# Altium PCB Stepper Board-v1.0.PcbDoc (part 8 of 8)
Units mil, origin at the board's own origin, x right, y up, seen from the top; angles counter-clockwise.
Board outline 6225.19 x 6531 mil, 4 copper layers (Top Layer, Layer-1, Layer-2, Bottom Layer), stack 61.654 mil thick; 410 components, 372 nets, 1464 pads, 1083 vias.
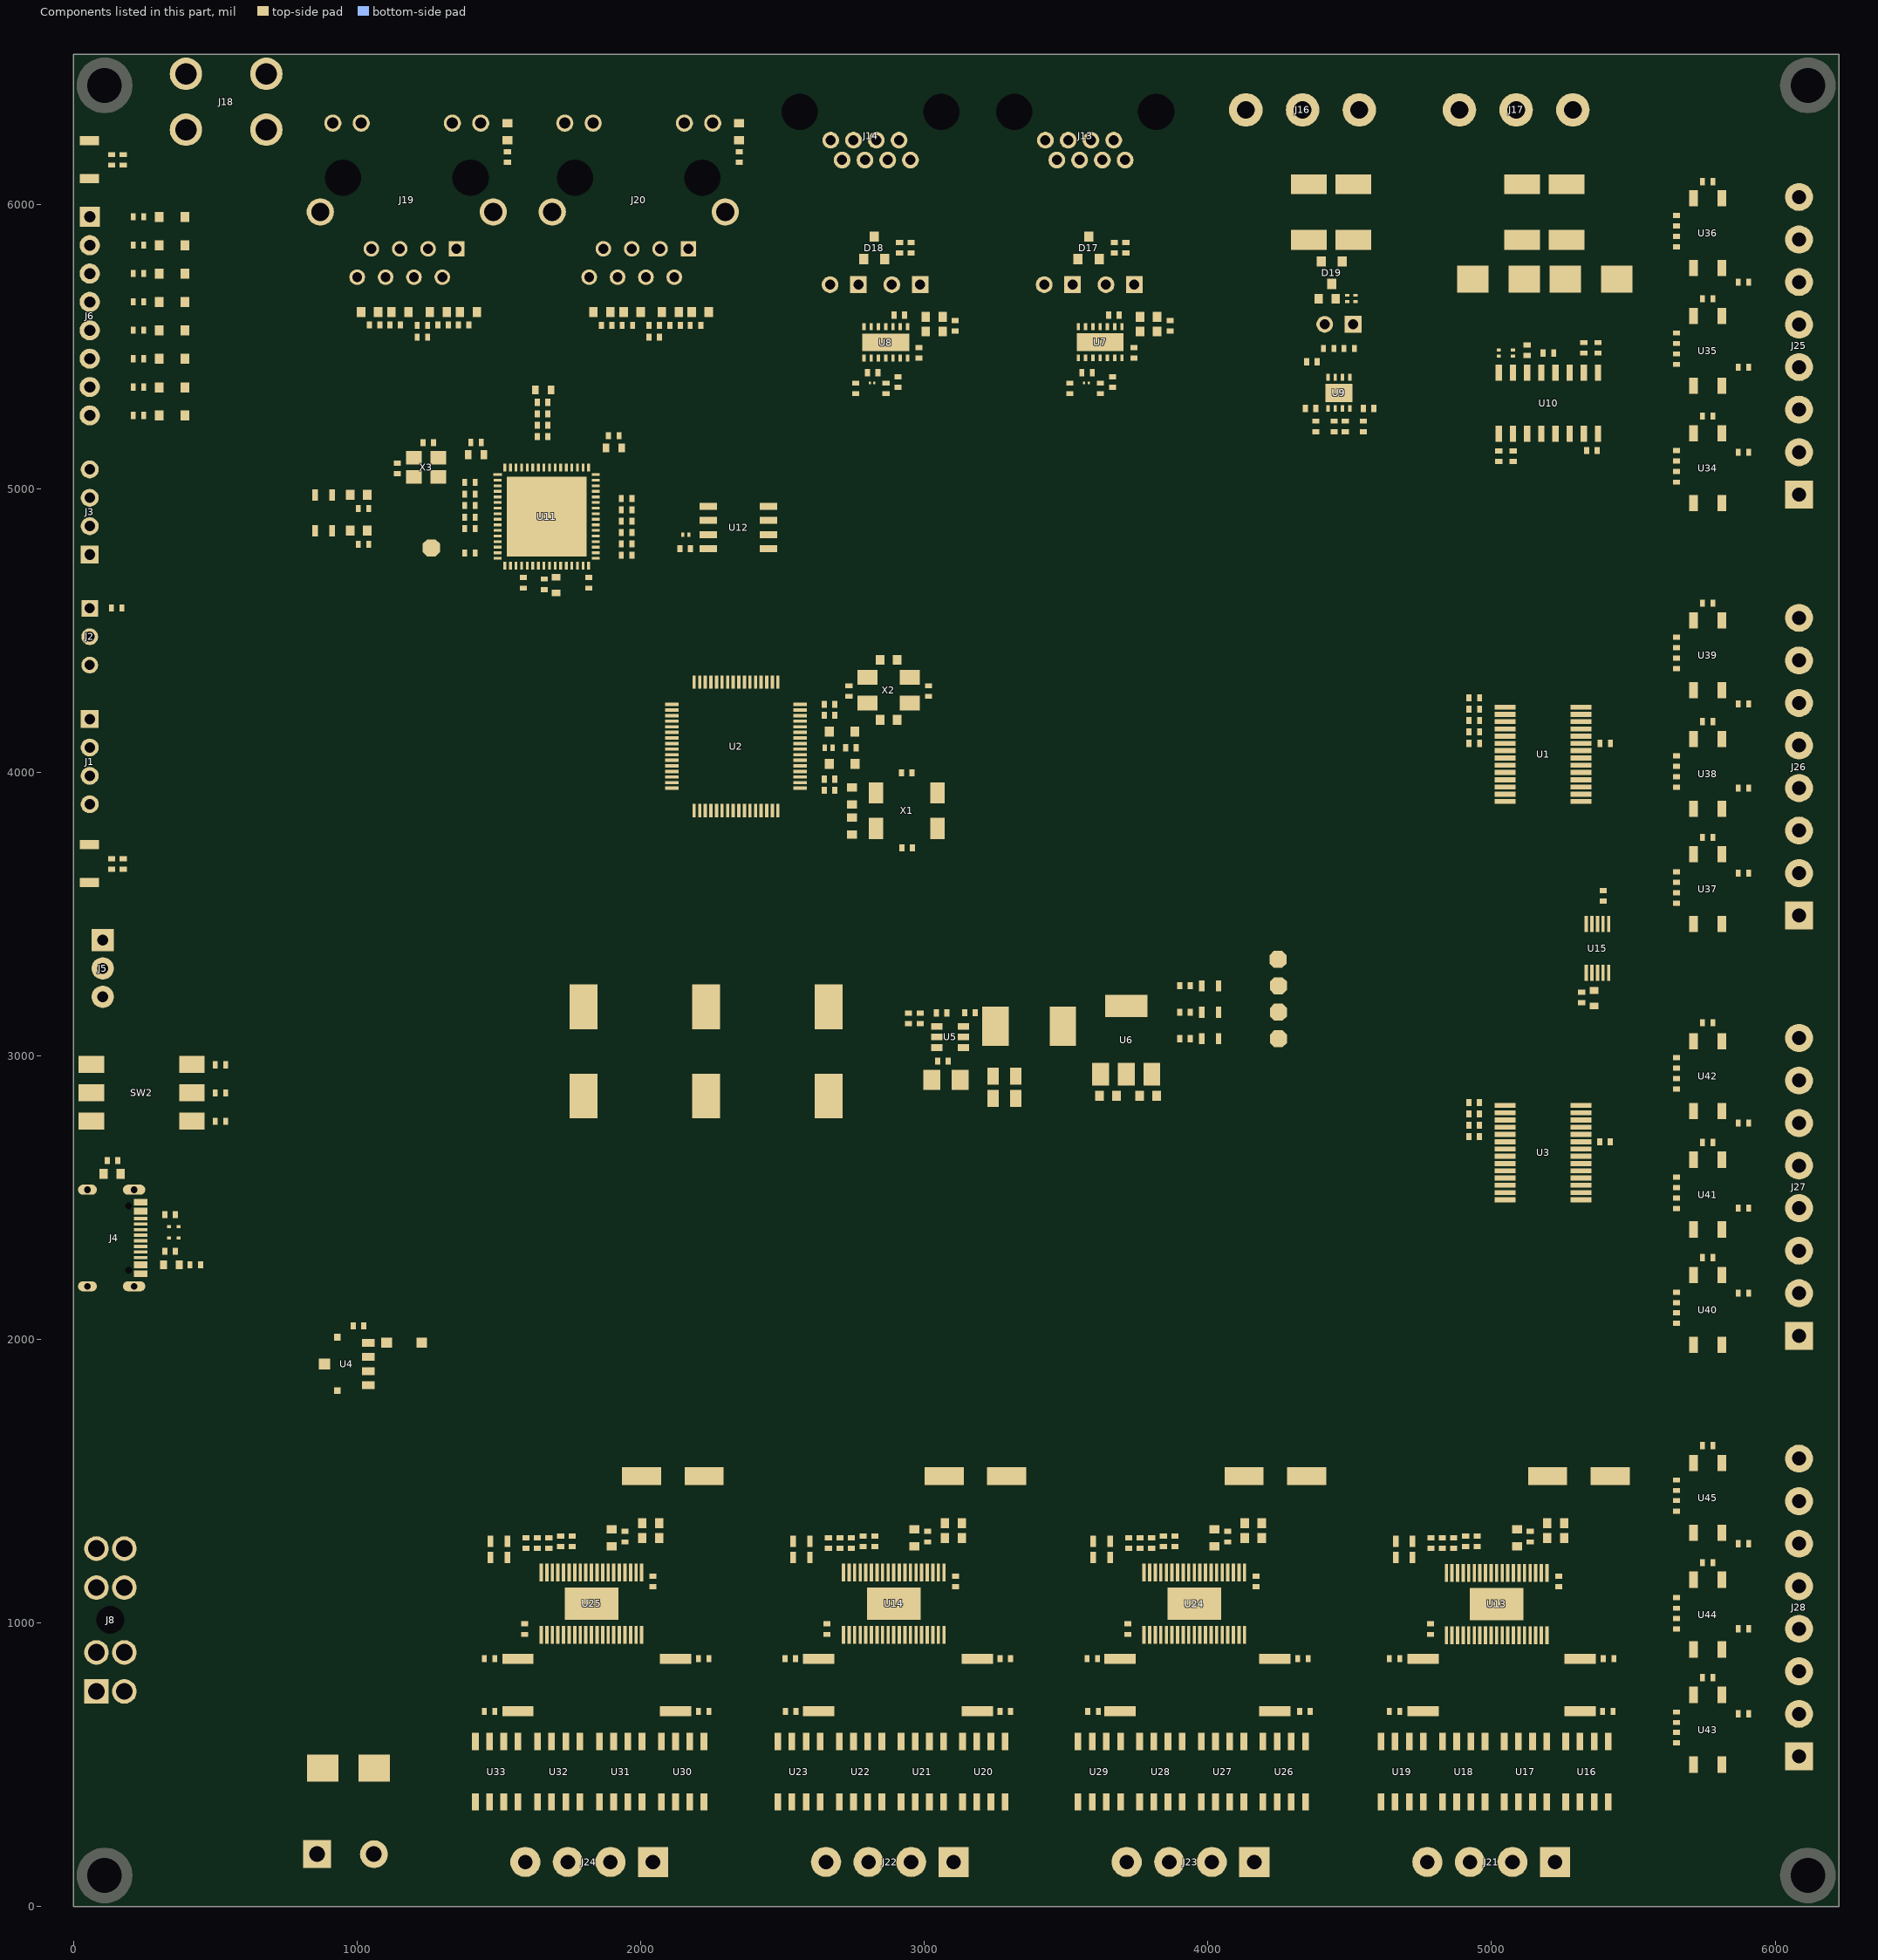
[diagram p7: the components of this part, seen from the top]

## Polygon pours and split planes (outlines as drawn) (continued)
BOUT1-1 on Layer-1 "NONET_L-01_P-001" (solid, remove dead copper, pour order 104): 5004,451.98 4924,451.98 4924,279.5 4989.33,279.5 4989.33,81.34 4846,81.34 4846,233.34 4786,293.34 4786,552 5004,552
BOUT2-1 on Layer-1 "NONET_L-01_P-001" (solid, remove dead copper, pour order 103): 4774,272.98 4832.23,214.75 4832.23,86.98 4498,86.98 4498,449.98 4498,553 4774,553
AOUT2-2 on Layer-1 "NONET_L-01_P-001" (solid, remove dead copper, pour order 98): 3960.56,451.98 4036.67,451.98 4036.67,278.86 3939.67,278.86 3939.67,81.34 4088.67,81.34 4088.67,214.12 4174.67,300.12 4174.67,552 4054.67,552 3960.56,552
AOUT1-2 on Layer-1 "NONET_L-01_P-001" (solid, remove dead copper, pour order 97): 4450.67,552 4450.67,85 4099.52,85 4099.52,200.85 4187.67,289 4187.67,552
BOUT1-2 on Layer-1 "NONET_L-01_P-001" (solid, remove dead copper, pour order 96): 3943.67,451.98 3863.67,451.98 3863.67,279.5 3929,279.5 3929,81.34 3785.67,81.34 3785.67,233.34 3725.67,293.34 3725.67,552 3943.67,552
BOUT2-2 on Layer-1 "NONET_L-01_P-001" (solid, remove dead copper, pour order 95): 3713.67,272.98 3771.9,214.75 3771.9,86.98 3437.67,86.98 3437.67,449.98 3437.67,553 3713.67,553
AOUT2-3 on Layer-1 "NONET_L-01_P-001" (solid, remove dead copper, pour order 90): 2900.22,451.98 2976.33,451.98 2976.33,280 2879.33,280 2879.33,81.34 3028.33,81.34 3028.33,214.12 3114.33,300.12 3114.33,552 2994.33,552 2900.22,552
AOUT1-3 on Layer-1 "NONET_L-01_P-001" (solid, remove dead copper, pour order 89): 3390.33,552 3390.33,85 3039.18,85 3039.18,200.85 3127.33,289 3127.33,552
BOUT1-3 on Layer-1 "NONET_L-01_P-001" (solid, remove dead copper, pour order 88): 2883.33,451.98 2803.33,451.98 2803.33,279.5 2868.67,279.5 2868.67,81.34 2725.33,81.34 2725.33,233.34 2665.33,293.34 2665.33,552 2883.33,552
BOUT2-3 on Layer-1 "NONET_L-01_P-001" (solid, remove dead copper, pour order 87): 2653.33,272.98 2711.57,214.75 2711.57,86.98 2377.33,86.98 2377.33,449.98 2377.33,553 2653.33,553
AOUT1-4 on Layer-1 "NONET_L-01_P-001" (solid, remove dead copper, pour order 77): 2330,552 2330,85 1978.85,85 1978.85,200.85 2067,289 2067,552
BOUT2-4 on Layer-1 "NONET_L-01_P-001" (solid, remove dead copper, pour order 73): 1593,272.98 1651.23,214.75 1651.23,86.98 1317,86.98 1317,449.98 1317,553 1593,553
AOUT2-4 on Layer-1 "NONET_L-01_P-001" (solid, remove dead copper, pour order 78): 1839.89,451.98 1916,451.98 1916,278.86 1819,278.86 1819,81.34 1968,81.34 1968,214.12 2054,300.12 2054,552 1934,552 1839.89,552
BOUT1-4 on Layer-1 "NONET_L-01_P-001" (solid, remove dead copper, pour order 74): 1823,451.98 1743,451.98 1743,279.5 1808.33,279.5 1808.33,81.34 1665,81.34 1665,233.34 1605,293.34 1605,552 1823,552
VDD12TX1 on Layer-1 "NONET_L-01_P-001" (solid, remove dead copper, pour order 24): 1647,4609 1647,4726 1593,4726 1572,4726 1572,5274.25 1674.5,5274.25 1674.5,5093.41 1753.25,5093.41 1753.25,4609
+24V on Bottom Layer "NONET_L-01_P-001" (solid, remove dead copper, pour order 40): 3393,3050 3393,2718.19 5634,2718.19 5634,485.3 6211.28,485.3 6211.28,17 1332,17 1332,3050
+5V on Bottom Layer "NONET_L-01_P-001" (solid, remove dead copper, pour order 20): 3416,2752.36 3416,3066.01 2881,3066.01 2881,3394 5597,3394 5650,3447 5650,5383 2738.11,5383 2738.11,5721 5636.39,5721 5636.39,6120.31 6213,6120.31 6213,529.29 5670,529.29 5670,2752.36
GND on Bottom Layer "NONET_L-01_P-001" (solid, remove dead copper, pour order 86): 2830,3419 2830,3079 1278.98,3079 1278.98,9 11,9 11,6524 6222.19,6524 6222.19,3419
NetFB1_1 on Bottom Layer "NONET_L-01_P-001" (solid, remove dead copper, pour order 27): 295.32,2479.69 115,2479.69 115,2234.21 329.25,2234.21 329.25,2284.47 202.51,2284.47 202.51,2435.28 295.32,2435.28
NetD14_2 on Bottom Layer "NETD14_2_L04_P022" (solid, remove dead copper, pour order 22): 11,946.5 11,9 947,9 947,945.5 314,945.5 314,946.5
GND on Layer-2 "NONET_L-01_P-001" (solid, remove dead copper, pour order 79): 11,6524 6213,6524 6213,12 11,12
VDDCR on Layer-2 "NONET_L-01_P-001" (solid, remove dead copper, pour order 28): 1850.69,5004 1850.69,4863 1930.3,4863 1930.3,4788.33 1757.13,4788.33 1757.13,4659.53 1688.39,4659.53 1688.39,4929 1424,4929 1424,5004

## Other copper
Top Layer:
  rectangle net +3V3: 1671,5331.25 1724,5366
  region net VDD33TXRX1: 1853.3,5348.76 1853.3,5126.55 1898.41,5126.55 1898.41,5348.76
  rectangle net VDD33TXRX2: 1425.6,5103 1471.55,5320
  rectangle net SPI2_MISO: 1663.56,1242.5 1691.56,1272.5
  rectangle net SPI2_MISO: 2730.56,1242.5 2758.56,1272.5
  rectangle net SPI2_MISO: 4854.56,1242.5 4882.56,1272.5
  rectangle net SPI2_MISO: 3788.99,1242.5 3816.99,1272.5
  rectangle net AISENN-2: 4341.5,857.02 4396,890.24
  rectangle net +24V: 4029.43,1400.07 4219.43,1667.07
  region net GND_B-3: 2559.19,709 2538.19,709 2538.19,666 2559.19,666
  rectangle net GND_A-3: 3258,666 3279,709
  rectangle net GND: 4664.17,855.31 4761.17,890.74
  region net BISENN-1: 4653.67,890.74 4599.17,890.74 4599.17,857.52 4653.67,857.52
  rectangle net GND: 3595.17,855.63 3692.17,891.07
  region net BISENN-2: 3584.67,890.07 3530.17,890.07 3530.17,856.85 3584.67,856.85
  rectangle net GND: 2531.17,856.28 2628.17,891.72
  region net BISENN-3: 2520.67,890.72 2466.17,890.72 2466.17,857.5 2520.67,857.5
  rectangle net GND: 1472.17,855.8 1569.17,891.24
  region net BISENN-4: 1461.67,890.24 1407.17,890.24 1407.17,857.02 1461.67,857.02
  region net GND: 2219.69,891.72 2122.69,891.72 2122.69,856.28 2219.69,856.28
  rectangle net AISENN-4: 2230.19,857.5 2284.69,890.72
  region net GND: 3284.17,891.72 3187.17,891.72 3187.17,856.28 3284.17,856.28
  rectangle net AISENN-3: 3294.67,857.5 3349.17,890.72
  region net GND: 4331,891.24 4234,891.24 4234,855.8 4331,855.8
  rectangle net AISENN-1: 5417.5,857.02 5472,890.24
  rectangle net AISENP-1: 5419.5,671.98 5471,705.2
  rectangle net AISENP-2: 4348.5,671.98 4403,705.2
  rectangle net AISENP-3: 3289.5,671.98 3344,705.2
  rectangle net AISENP-4: 2229.5,671.98 2284,705.2
  region net BISENP-4: 1462.83,660 1462.83,731.04 1431.83,731.04 1431.83,660
  region net GND_B-4: 1494.52,709 1473.52,709 1473.52,666 1494.52,666
  region net BISENP-3: 2527.5,660 2527.5,731.04 2496.5,731.04 2496.5,660
  region net GND_B-2: 3618.19,709 3597.19,709 3597.19,666 3618.19,666
  rectangle net GND_B-2: 3597.19,675.98 3651.94,700.98
  region net BISENP-2: 3586.5,660 3586.5,731.04 3555.5,731.04 3555.5,660
  region net GND_B-1: 4686.19,709 4665.19,709 4665.19,666 4686.19,666
  rectangle net GND_A-4: 2196,666 2217,709
  rectangle net GND_A-2: 4317,666 4338,709
  region net GND_A-2: 4338.17,659.56 4338.17,680.56 4295.17,680.56 4295.17,659.56
  region net GND_A-1: 5406.17,659.56 5406.17,680.56 5363.17,680.56 5363.17,659.56
  rectangle net GND_A-1: 5385,660 5406,715
  region net BISENP-1: 4654.5,660 4654.5,731.04 4623.5,731.04 4623.5,660
  rectangle net GND_B-1: 4671.69,675.98 4726.19,700.98
  region net +5V: 5846.89,5441.79 5846.89,5382.8 5879.77,5382.8 5879.77,5441.79
  region net +5V: 5846.89,2476.13 5846.89,2417.13 5879.77,2417.13 5879.77,2476.13
  region net +5V: 5846.89,992.79 5846.89,933.8 5879.77,933.8 5879.77,992.79
  region net +5V: 5879.77,1265.79 5879.77,1324.79 5846.89,1324.79 5846.89,1265.79
  region net +5V: 5879.77,665.79 5879.77,724.79 5846.89,724.79 5846.89,665.79
  region net +5V: 5879.77,5714.79 5879.77,5773.79 5846.89,5773.79 5846.89,5714.79
  region net +5V: 5879.77,5114.79 5879.77,5173.79 5846.89,5173.79 5846.89,5114.79
  region net +5V: 5879.77,2149.13 5879.77,2208.12 5846.89,2208.12 5846.89,2149.13
  region net +5V: 5879.77,2748.79 5879.77,2807.79 5846.89,2807.79 5846.89,2748.79
  region net +5V: 5879.77,3630.46 5879.77,3689.45 5846.89,3689.45 5846.89,3630.46
  region net +5V: 5879.77,4227.46 5879.77,4286.45 5846.89,4286.45 5846.89,4227.46
  rectangle net DIR+_1: 5890.89,5415.79 5946.14,5440.79
  region net +5V: 5851,3957.46 5851,3898.47 5883.89,3898.47 5883.89,3957.46
  rectangle net DIR+_3: 5893.89,3931.46 5949.14,3956.46
  rectangle net DIR+_2: 5890.89,2450.13 5946.14,2475.13
  rectangle net PUL+_1: 5890.89,5715.79 5946.14,5740.79
  rectangle net ENA+_1: 5890.89,5115.79 5946.14,5140.79
  rectangle net PUL+_3: 5890.89,4228.46 5946.14,4253.46
  rectangle net ENA+_3: 5890.89,3631.46 5946.14,3656.46
  rectangle net PUL+_2: 5890.89,2749.79 5946.14,2774.79
  rectangle net ENA+_2: 5890.89,2150.13 5946.14,2175.13
  rectangle net PUL+_4: 5890.89,1266.79 5946.14,1291.79
  rectangle net DIR+_4: 5890.89,966.79 5946.14,991.79
  rectangle net ENA+_4: 5890.89,666.79 5946.14,691.79
  region net GND: 5407,891.24 5310,891.24 5310,855.8 5407,855.8
  rectangle net +24V: 4279.54,27 4680,435.3
  rectangle net +24V: 3213.54,22 3613,435.3
  rectangle net +24V: 2153,21 2550,435.3
  rectangle net +24V: 1395.54,291.32 1482.51,435.3
  region net +24V: 5433.46,435.3 5346.49,435.3 5346.49,291.32 5433.46,291.32
  rectangle net +24V: 4915.52,333.49 5106.48,394.52
  rectangle net +24V: 4916.55,291.32 5110.18,435.3
  rectangle net +24V: 3847.52,338.19 4038.48,399.21
  rectangle net +24V: 3848.55,296.02 4042.18,440
  rectangle net +24V: 2789.55,296.02 2983.18,440
  rectangle net GND: 3661,2789.03 3765,3158
  rectangle net AOUT1-4: 2069.19,338.19 2142.81,399.21
  rectangle net AOUT2-4: 1951.86,338.19 2025.48,399.21
  rectangle net +24V: 1722.52,296.02 1916.14,440
  rectangle net BOUT1-4: 1634.52,338.19 1708.14,399.21
  rectangle net BOUT2-4: 1517.19,338.19 1590.81,399.21
  rectangle net AOUT1-3: 3129.52,338.19 3203.14,399.21
  rectangle net AOUT2-3: 3012.19,338.19 3085.81,399.21
  rectangle net BOUT1-3: 2694.86,338.19 2768.48,399.21
  rectangle net BOUT2-3: 2577.52,338.19 2651.14,399.21
  rectangle net AOUT1-2: 4189.86,338.19 4263.48,399.21
  rectangle net AOUT2-2: 4072.52,338.19 4146.14,399.21
  rectangle net BOUT1-2: 3755.19,338.19 3828.81,399.21
  rectangle net BOUT2-2: 3637.86,338.19 3711.48,399.21
  rectangle net GND: 2522,3079 2779,3275
  rectangle net GND: 2089.5,3079 2346.5,3275
  rectangle net GND: 1657,3079 1914,3275
  rectangle net +24V: 1405.19,338.19 1478.81,399.21
  rectangle net BOUT2-4: 1505.19,338.19 1578.81,399.21
  rectangle net BOUT1-4: 1623.86,338.19 1697.48,399.21
  rectangle net +24V: 1723.86,338.19 1916.14,399.21
  rectangle net AOUT2-4: 1942.52,338.19 2016.14,399.21
  rectangle net AOUT1-4: 2061.19,338.19 2134.81,399.21
  rectangle net BOUT2-3: 2571.19,338.19 2644.81,399.21
  rectangle net BOUT1-3: 2688.52,338.19 2762.14,399.21
  rectangle net +24V: 2788.52,338.19 2979.48,399.21
  rectangle net AOUT2-3: 3005.86,338.19 3079.48,399.21
  rectangle net AOUT1-3: 3123.19,338.19 3196.81,399.21
  rectangle net BOUT2-2: 3630.19,338.19 3703.81,399.21
  rectangle net BOUT1-2: 3747.52,338.19 3821.14,399.21
  rectangle net AOUT2-2: 4064.86,338.19 4138.48,399.21
  rectangle net BOUT2-1: 4698.19,338.19 4771.81,399.21
  rectangle net BOUT1-1: 4815.52,338.19 4889.14,399.21
  rectangle net AOUT2-1: 5132.86,338.19 5206.48,399.21
  rectangle net AOUT1-1: 5250.19,338.19 5323.81,399.21
  rectangle net +24V: 5100,1400.07 5290,1667.07
  rectangle net +24V: 2972,1400.07 3162,1667.07
  rectangle net +24V: 1905,1400.07 2095,1667.07
  rectangle net GND: 5072.55,1313.15 5148.73,1333.15
  rectangle net GND: 4006.55,1314.48 4082.73,1334.48
  rectangle net GND: 2946.55,1315.13 3022.73,1335.13
  rectangle net GND: 1880.54,1315.13 1956.73,1335.13
  rectangle net GND: 5096.85,1009.17 5151,1123.35
  rectangle net GND: 4030.85,1010.5 4087,1124.67
  rectangle net GND: 1904.85,1011.15 1958,1125.32
  rectangle net GND: 2970.85,1011.82 3025,1126
  region net GND: 4993.52,5823 4879.09,5823 4879.09,5647 4993.52,5647
  rectangle net GND: 5382,5647 5496.43,5823
  rectangle net AOUT1-2: 4182.19,338.19 4255.81,399.21
  region net NetR128_2: 5733.89,5746.19 5733.89,5863.62 5687.56,5863.62 5687.56,5746.19
  region net NetR128_2: 5732.67,5863.62 5638.89,5863.62 5638.89,5832.58 5732.67,5832.58
  region net NetR127_2: 5733.89,5332.19 5733.89,5449.62 5687.56,5449.62 5687.56,5332.19
  region net NetR127_2: 5732.67,5449.62 5638.89,5449.62 5638.89,5418.58 5732.67,5418.58
  region net NetR126_2: 5733.89,4917.19 5733.89,5034.62 5687.56,5034.62 5687.56,4917.19
  region net NetR126_2: 5732.67,5034.62 5638.89,5034.62 5638.89,5003.58 5732.67,5003.58
  region net NetR131_2: 5733.89,4259.19 5733.89,4376.62 5687.56,4376.62 5687.56,4259.19
  region net NetR131_2: 5732.67,4376.62 5638.89,4376.62 5638.89,4345.58 5732.67,4345.58
  region net NetR130_2: 5733.89,3840.69 5733.89,3958.12 5687.56,3958.12 5687.56,3840.69
  region net NetR130_2: 5732.67,3958.12 5638.89,3958.12 5638.89,3927.08 5732.67,3927.08
  region net NetR129_2: 5733.89,3432.19 5733.89,3549.62 5687.56,3549.62 5687.56,3432.19
  region net NetR129_2: 5732.67,3549.62 5638.89,3549.62 5638.89,3518.58 5732.67,3518.58
  region net NetR146_2: 5733.89,2777.19 5733.89,2894.62 5687.56,2894.62 5687.56,2777.19
  region net NetR146_2: 5732.67,2894.62 5638.89,2894.62 5638.89,2863.58 5732.67,2863.58
  region net NetR145_2: 5733.89,2355.69 5733.89,2473.12 5687.56,2473.12 5687.56,2355.69
  region net NetR145_2: 5732.67,2473.12 5638.89,2473.12 5638.89,2442.08 5732.67,2442.08
  region net NetR144_2: 5733.89,1951.19 5733.89,2068.62 5687.56,2068.62 5687.56,1951.19
  region net NetR144_2: 5732.67,2068.62 5638.89,2068.62 5638.89,2037.58 5732.67,2037.58
  region net NetR149_2: 5733.89,1288.69 5733.89,1406.12 5687.56,1406.12 5687.56,1288.69
  region net NetR149_2: 5732.67,1406.12 5638.89,1406.12 5638.89,1375.08 5732.67,1375.08
  region net NetR148_2: 5733.89,873.19 5733.89,990.62 5687.56,990.62 5687.56,873.19
  region net NetR148_2: 5732.67,990.62 5638.89,990.62 5638.89,959.58 5732.67,959.58
  region net NetR147_2: 5732.67,589.12 5638.89,589.12 5638.89,558.08 5732.67,558.08
  region net NetR147_2: 5733.89,471.69 5733.89,589.12 5687.56,589.12 5687.56,471.69
  region net NetR153_1: 5687.56,822.5 5687.56,673.96 5733.89,673.96 5733.89,822.5
  region net NetR153_1: 5732.67,705 5638.89,705 5638.89,673.96 5732.67,673.96
  rectangle net NetR153_1: 5687.56,791.46 5756.39,822.5
  region net NetR154_1: 5687.56,1225.5 5687.56,1076.96 5733.89,1076.96 5733.89,1225.5
  region net NetR154_1: 5732.67,1108 5638.89,1108 5638.89,1076.96 5732.67,1076.96
  rectangle net NetR154_1: 5687.56,1194.46 5756.39,1225.5
  region net NetR155_1: 5687.56,1640.5 5687.56,1491.96 5733.89,1491.96 5733.89,1640.5
  region net NetR155_1: 5732.67,1523 5638.89,1523 5638.89,1491.96 5732.67,1491.96
  rectangle net NetR155_1: 5687.56,1609.46 5756.39,1640.5
  region net NetR150_1: 5687.56,2303 5687.56,2154.46 5733.89,2154.46 5733.89,2303
  region net NetR150_1: 5732.67,2185.5 5638.89,2185.5 5638.89,2154.46 5732.67,2154.46
  rectangle net NetR150_1: 5687.56,2271.96 5756.39,2303
  region net NetR151_1: 5687.56,2708.5 5687.56,2559.96 5733.89,2559.96 5733.89,2708.5
  region net NetR151_1: 5732.67,2591 5638.89,2591 5638.89,2559.96 5732.67,2559.96
  rectangle net NetR151_1: 5687.56,2677.46 5756.39,2708.5
  region net NetR152_1: 5687.56,3130.5 5687.56,2981.96 5733.89,2981.96 5733.89,3130.5
  region net NetR152_1: 5732.67,3013 5638.89,3013 5638.89,2981.96 5732.67,2981.96
  rectangle net NetR152_1: 5687.56,3099.46 5756.39,3130.5
  region net NetR135_1: 5687.56,3785.5 5687.56,3636.96 5733.89,3636.96 5733.89,3785.5
  region net NetR135_1: 5732.67,3668 5638.89,3668 5638.89,3636.96 5732.67,3636.96
  rectangle net NetR135_1: 5687.56,3754.46 5756.39,3785.5
  region net NetR136_1: 5687.56,4194 5687.56,4045.46 5733.89,4045.46 5733.89,4194
  region net NetR136_1: 5732.67,4076.5 5638.89,4076.5 5638.89,4045.46 5732.67,4045.46
  rectangle net NetR136_1: 5687.56,4162.96 5756.39,4194
  region net NetR137_1: 5687.56,4612.5 5687.56,4463.96 5733.89,4463.96 5733.89,4612.5
  region net NetR137_1: 5732.67,4495 5638.89,4495 5638.89,4463.96 5732.67,4463.96
  rectangle net NetR137_1: 5687.56,4581.46 5756.39,4612.5
  region net NetR132_1: 5687.56,5270.5 5687.56,5121.96 5733.89,5121.96 5733.89,5270.5
  region net NetR132_1: 5732.67,5153 5638.89,5153 5638.89,5121.96 5732.67,5121.96
  rectangle net NetR132_1: 5687.56,5239.46 5756.39,5270.5
  region net NetR133_1: 5687.56,5685.5 5687.56,5536.96 5733.89,5536.96 5733.89,5685.5
  region net NetR133_1: 5732.67,5568 5638.89,5568 5638.89,5536.96 5732.67,5536.96
  rectangle net NetR133_1: 5687.56,5654.46 5756.39,5685.5
  rectangle net NetR134_1: 5687.56,6068.46 5756.39,6099.5
  region net NetR134_1: 5732.67,5982 5638.89,5982 5638.89,5950.96 5732.67,5950.96
  region net NetR134_1: 5687.56,6099.5 5687.56,5950.96 5733.89,5950.96 5733.89,6099.5
  region net +3V3: 2660.75,3924.18 2660.75,4047.44 2636.75,4047.44 2636.75,3924.18
  rectangle net +3V3: 2636.38,4008.64 2698.64,4048.01
  region net +3V3: 2695.5,4186.81 2695.5,4252.31 2674,4252.31 2674,4186.81
  region net GND: 2695.5,3922.93 2695.5,3988.43 2674,3988.43 2674,3922.93
  region net GND: 2778.13,4010.76 2778.13,4161.34 2750.5,4161.34 2750.5,4010.76
  region net NetC9_2: 2705.13,4068 2705.13,4160.72 2665.76,4160.72 2665.76,4068
  rectangle net NetC9_2: 2666,4067.38 2731.5,4106.75
  region net NetC78_1: 5299,3242.99 5299,3214 5379.54,3214 5379.54,3242.99
  rectangle net GND: 1660.98,5167.2 1684.3,5316.5
  rectangle net NetR75_2: 1626.5,5250.5 1649.82,5284
  rectangle net VDDCR: 1643.55,4672.02 1752.21,4698.89
  region net NetFB1_2: 419.5,2280 360.75,2280 360.75,2247.25 419.5,2247.25
  rectangle net +5V: 438.5,2246 495,2278.98
  rectangle net NetC10_2: 146.5,2509.06 259.63,2643.5
  rectangle net NetD13_1: 1011,1964 1131,2064
  region net NetJ8_3: 985,1079 985,2020 11,2020 11,1079
  rectangle net NetJ8_3: 16.39,1080.03 318.01,1966.01
  rectangle net +3V3: 4432.43,5183 4565,5213.75
  rectangle net RE/DE/RS485/T: 4441.05,5228.75 4482.25,5294.24
  region net GND: 5345.76,5270 5313.76,5270 5313.76,5117 5345.76,5117
  rectangle net +3V3: 5360.76,5117 5391,5270
  rectangle net +3V3: 835.55,4791.02 879.55,4997.21
  region net +3V3: 4374.55,5469.67 4374.55,5380.67 4429.55,5380.67 4429.55,5469.67
  region net "CHASIS GND": 2.15,52.1 2.15,182.28 cw(c7.16,182.28) 4.91,186.76 cw(c9.3,184.56) 5.37,187.51 cw(c111.17,108.44) 243.24,108.44 cw(c111.16,108.44) 191.08,3.28 cw(c188.05,7.26) 188.05,2.26 2.15,2.26
  region net "CHASIS GND": 6223.04,52.1 6223.04,182.28 ccw(c6218.03,182.28) 6220.28,186.76 ccw(c6215.89,184.56) 6219.81,187.51 ccw(c6114.02,108.44) 5981.94,108.43 ccw(c6114.02,108.43) 6034.1,3.28 ccw(c6037.14,7.26) 6037.14,2.26 6223.04,2.26
  region net "CHASIS GND": 6223.04,6478.9 6223.04,6348.72 cw(c6218.03,6348.72) 6220.28,6344.24 cw(c6215.89,6346.44) 6219.81,6343.49 cw(c6114.02,6422.56) 5981.94,6422.57 cw(c6114.02,6422.57) 6034.1,6527.72 cw(c6037.14,6523.74) 6037.14,6528.74 6223.04,6528.74
  pour cut-out: 801,6525.08 801,6522.38 801,5597.99 803,5595.99 2402,5595.99 2402,5837 3924,5837 3924,6524.44 3923.36,6525.08
  region net "CHASIS GND": 2.15,6478.9 2.15,6348.72 ccw(c7.16,6348.72) 4.91,6344.24 ccw(c9.3,6346.44) 5.37,6343.49 ccw(c111.16,6422.56) 243.24,6422.57 ccw(c111.16,6422.57) 191.08,6527.72 ccw(c188.05,6523.74) 188.05,6528.74 2.15,6528.74
Layer-1:
  region net VDD33TXRX2: 1426,5581 1426,5288 1471,5288 1471,5581
  rectangle net VDD33TXRX2: 1425.1,5549.41 1830,5593.21
Bottom Layer:
  region net VDD33TXRX1: 1898,5352 1730,5352 1730,5307 1898,5307
  region net VDD33TXRX1: 1775,5307 1775,5682.72 1730,5682.72 1730,5307
  region net VDD33TXRX2: 1830,5550 1830,5681.81 1785,5681.81 1785,5550
  rectangle net VDD33TXRX1: 996.63,5637.72 1739.83,5682.72
  rectangle net VDD33TXRX2: 1815,5637.55 2258,5682.55
  region net NetJ8_3: 985,1079 985,2020 11,2020 11,1079
  pour cut-out: 801,6525.08 801,6522.38 801,5597.99 803,5595.99 2402,5595.99 2402,5837 3924,5837 3924,6524.44 3923.36,6525.08

## Silkscreen, mask and mechanical layers (free items; w line width, h text height)
Top Overlay:
  lines w5: 2840,2135 2840,2245 3949,2245 3949,2135 3631,2135 2840,2135
  lines w6: 988,5549.29 988,5651.98 1448.12,5651.98 1448.12,5549.29 1269.12,5549.29 1269.12,5509.38 1188.04,5509.38 ; 989,5549.29 1188.12,5549.29 1188.12,5509.97 ; 1807,5550.32 1807,5652.01 1808,5653.01 2267,5653.01 2267,5550.32 2088,5550.32 2088,5510.41 2006.93,5510.41 ; 1808,5550.32 2007,5550.32 2007,5511 ; 742,5348.57 742,5470.26 1390,5470.26 1390,5348.57 1129.39,5348.57 1129.39,5285 993,5285 993,5348.57 742,5348.57 ; 1338,4359 1475.03,4359 1475.03,4640 1338,4640 1338,4359 ; 1357.2,4833.8 1357.7,4833.3 1357.39,4833 1463,4833 1463,5047 1357.2,5047 1357.2,4833.8 ; 1576.48,5158.8 1692.33,5158.8 1692.33,5372.8 1576.48,5372.8 1576.48,5158.8 ; 1790.9,5335 2041.9,5335 2041.9,5271.43 2178.29,5271.43 2178.29,5335 2433,5335 2433,5456.69 1790.9,5456.69 1790.9,5335 ; 2606,4805 2748,4805 2748,5094.63 2606,5094.63 2606,4805 ; 2625.7,3911.25 2625.7,4261 2705,4261 2705,4184 2779.71,4184 2779.71,3991.11 2705.13,3991.11 2705.13,3911.25 2625.7,3911.25 ; 3139.26,3870.88 3268.69,3870.88 3268.69,3990 3318,3990 3318,4167.48 3268.57,4167.48 3268.57,4284.48 3139.26,4284.48 3139.26,3870.88
  lines w7: 380,2291.68 403,2291.68 ; 380,2457.68 403,2457.68 ; 385,2355.68 403,2355.68 ; 385,2400 403,2400 ; 1555,1365 1555,1342.87 1576.87,1321 ; 1619.87,1324 1619.87,1364 ; 1659.87,1323 1659.87,1364 ; 1701.87,1328 1701.87,1362 ; 1747.87,1331 1747.87,1362 ; 2095.13,1299 2116.13,1299 ; 2631,1363 2631,1332 2644,1319 ; 2687,1322 2687,1362 ; 2727,1321 2727,1362 ; 2769,1326 2769,1360 ; 2815,1329 2815,1360 ; 2826.55,5316.46 2826.55,5356.46 ; 2912.96,5880.91 2912.96,5895.93 2920.96,5903.93 2969.58,5903.93 ; 3158.13,1299 3179.13,1299 ; 3159.13,1299 3180.13,1299 ; 3582.55,5315.46 3582.55,5355.46 ; 3670.03,5880.98 3670.03,5896 3678.03,5904 3726.65,5904 ; 3688.43,1363 3688.43,1332 3701.43,1319 ; 3744.43,1322 3744.43,1362 ; 3784.43,1321 3784.43,1362 ; 3826.43,1326 3826.43,1360 ; 3872.43,1329 3872.43,1360 ; 4216.56,1299 4237.56,1299 ; 4548.16,5171 4548.16,5182 ; 4755,1363 4755,1332 4768,1319 ; 4811,1322 4811,1362 ; 4851,1321 4851,1362 ; 4866,4069.08 4889.08,4069.08 4902,4082 ; 4869,4128.08 4902.46,4128.08 ; 4869,4297.92 4892.08,4297.92 4905,4285 ; 4881,4181 4902,4181 ; 4893,1326 4893,1360 ; 4939,1329 4939,1360 ; 5284.13,1299 5306,1299
  lines w40: 30,2041 736,2041 808,2113 1318,2113 1318,1444 1210,1336 1210,21
  text "RS485" at 4717.1,6174.79 h75 r90
  text "RS232" at 5470.1,6174.79 h75 r90
  text "CAN - OUT" at 2488.69,6173.5 h75 r90
  text "CAN - IN" at 3245.69,6173.5 h75 r90
  text "C-GND" at 351,6121.39 h75
  text "EXT-DRIVER-1" at 5845.28,6109.01 h60
  text "N" at 4226.38,6082.78 h55
  text "P" at 4583.75,6082.78 h55
  text "TX" at 4964.75,6082.78 h55
  text "RX" at 5333.75,6082.78 h55
  text "E-RST" at 112.55,6053.23 h65
  text "EtherCAT-IN" at 856.54,6051.39 h75 r90
  text "EtherCAT-OUT" at 1670.54,6050.16 h75 r90
  text "@-1" at 901.57,5612.39 h50
  text "@-2" at 2276.08,5612.39 h50
  text "@-1" at 654.81,5430.69 h50
  text "@-2" at 2442.08,5416.39 h50
  text "a" at 1623.12,5379.43 h50
  text "DIGITAL IOs" at 187.54,5205.54 h75 r90
  text "a" at 2664.12,5100.43 h50
  text "*" at 1401.6,5035.63 h60
  text "RUN" at 633.5,4951.04 h60
  text "ERROR" at 631.32,4825 h60
  text "SWD PORT" at 187.5,4716 h75 r90
  text "WAIT" at 1188.71,4698.78 h60
  text "*" at 1394.49,4629.11 h60
  text "EXT-DRIVER-2" at 5845.28,4624.68 h60
  text "BOOT" at 187.54,4324.7 h75 r90
  text "~" at 3146.29,4282.64 h60
  text "~" at 2632.73,4259.16 h60
  text "DEBUG" at 187.54,3834.27 h75 r90
  text "RST" at 112.62,3561.23 h65
  text "GND" at 4078,3311 h60
  text "3V3" at 4081,3220.54 h60
  text "EXT-DRIVER-3" at 5845.28,3143.35 h60
  text "5V" at 4081,3127.27 h60
  text "I2C" at 320.54,3107.27 h75 r90
  text "24V" at 4081,3034 h60
  text "STEPPER BOARD - v1.0" at 2847.67,2142.8 h100
  text "USB" at 10.4,2089.48 h75
  text "EXT-DRIVER-4" at 5845.28,1660.01 h60
  text "FUSE" at 7.57,1408.99 h65
  text "DRIVER-4" at 2214.99,3.86 h65 r90
  text "DRIVER-3" at 3275.32,3.86 h65 r90
  text "DRIVER-2" at 4335.65,3.86 h65 r90
  text "DRIVER-1" at 5395.99,3.86 h65 r90
  text "24V INPUT" at 754.6,1 h75 r90
Bottom Overlay:
  drawing of 19 lines, arcs and shapes, not listed
  text "24V" at 6030.37,5993.67 h60
  text "PD9" at 259.11,5928.27 h60
  text "GND" at 6030.37,5843.67 h60
  text "PD8" at 259.11,5828.27 h60
  text "PC7" at 259.11,5728.05 h60
  text "PUL+_1" at 6034.14,5693.67 h60
  text "PC6" at 259.11,5628.02 h60
  text "PUL-_1" at 6030.37,5543.67 h60
  text "PA8" at 259.11,5528.27 h60
  text "PB15" at 259.47,5428.27 h60
  text "DIR+_1" at 6030.37,5393.67 h60
  text "PB14" at 259.66,5328.27 h60
  text "DIR-_1" at 6030.37,5243.67 h60
  text "PB13" at 259.11,5228.27 h60
  text "ENA+_1" at 6032.12,5093.67 h60
  text "ENA-_1" at 6030.37,4943.67 h60
  text "24V" at 6030.37,4509.33 h60
  text "GND" at 6030.37,4359.33 h60
  text "PUL+_3" at 6037.33,4209.33 h60
  text "PUL-_3" at 6030.57,4059.33 h60
  text "DIR+_3" at 6030.37,3909.33 h60
  text "DIR-_3" at 6030.37,3759.33 h60
  text "ENA+_3" at 6035.31,3609.33 h60
  text "ENA-_3" at 6033.55,3459.33 h60
  text "SCL" at 305.66,3378.06 h60
  text "SDA" at 305.11,3278.06 h60
  text "24V" at 6028.37,3028 h60
  text "GND" at 6028.37,2878 h60
  text "PUL+_2" at 6035.33,2728 h60
  text "PUL-_2" at 6028.57,2578 h60
  text "DIR+_2" at 6028.37,2428 h60
  text "DIR-_2" at 6028.37,2278 h60
  text "ENA+_2" at 6033.31,2128 h60
  text "ENA-_2" at 6031.55,1978 h60
  text "ZERO CARBON FOOTPRINT" at 5480,1614 h40
  text "24V" at 6028.37,1544.67 h60
  text "GND" at 6028.37,1394.67 h60
  text "PUL+_4" at 6027.85,1244.67 h60
  text "PUL-_4" at 6029.1,1094.67 h60
  text "DIR+_4" at 6028.4,944.67 h60
  text "DIR-_4" at 6028.37,794.67 h60
  text "ENA+_4" at 6028.84,644.67 h60
  text "ENA-_4" at 6026,494.67 h60
  text "AOUT1-3" at 3066.71,215.54 h60 r270
  text "AOUT1-2" at 4127.04,215.74 h60 r270
  text "AOUT1-4" at 2006.37,215.01 h60 r270
  text "BOUT1-3" at 2766.71,214.5 h60 r270
  text "AOUT2-3" at 2916.71,214.54 h60 r270
  text "BOUT1-2" at 3827.04,214.7 h60 r270
  text "AOUT2-2" at 3977.04,214.74 h60 r270
  text "BOUT2-1" at 4737.38,214.69 h60 r270
  text "BOUT1-1" at 4887.38,214.69 h60 r270
  text "BOUT1-4" at 1706.38,213.97 h60 r270
  text "AOUT2-4" at 1856.37,214.01 h60 r270
  text "BOUT2-3" at 2616.71,213.5 h60 r270
  text "BOUT2-2" at 3677.04,213.7 h60 r270
  text "BOUT2-4" at 1556.38,212.97 h60 r270
  text "AOUT2-1" at 5037.38,212.73 h60 r270
  text "AOUT1-1" at 5187.38,212.73 h60 r270
  text "24V" at 940.38,4.3 h85
  text "GND" at 1157.4,4.3 h85
Top Solder:
  rectangle: 247.94,1080 985,1780
  rectangle: 10,1407.34 765,2019
  rectangle: 257,10 780.49,279
  rectangle: 249.78,563 949,946
  rectangle: 10,256 780,613
Bottom Solder:
  rectangle: 10,1407.34 985,2019
  rectangle: 249.78,1080 985,1467
  rectangle: 253,8 780.49,248.8
  rectangle: 10,245 780,613
  rectangle: 249.78,248.8 949,946
Board Outline:
  the board outline again, w20
Fabrication:
  drawing of 295 lines, arcs and shapes, not listed
  text "Layer" at 6857.09,2372.99 h60
  text "Name" at 7267,2372.99 h60
  text "Material" at 8196.74,2372.99 h60
  text "Thickness" at 9056.51,2372.99 h60
  text "Constant" at 9706.35,2372.99 h60
  text "Board Layer Stack" at 10276.21,2372.99 h60
  text "Top Overlay" at 7267,2252.99 h60
  text "Top Solder" at 7267,2132.99 h60
  text "Solder Resist" at 8196.74,2132.99 h60
  text "0.39mil" at 9056.51,2132.99 h60
  text "3.5" at 9706.35,2132.99 h60
  text "1" at 6857.09,2012.99 h60
  text "Top Layer" at 7267,2012.99 h60
  text "1.38mil" at 9056.51,2012.99 h60
  text "Dielectric 2" at 7267,1892.99 h60
  text "PP-006" at 8196.74,1892.99 h60
  text "7.99mil" at 9056.51,1892.99 h60
  text "4.1" at 9706.35,1892.99 h60
  text "2" at 6857.09,1772.99 h60
  text "Layer-1" at 7267,1772.99 h60
  text "CF-004" at 8196.74,1772.99 h60
  text "1.18mil" at 9056.51,1772.99 h60
  text "Dielectric 1" at 7267,1652.99 h60
  text "FR-4" at 8196.74,1652.99 h60
  text "40.55mil" at 9056.51,1652.99 h60
  text "4.8" at 9706.35,1652.99 h60
  text "3" at 6857.09,1532.99 h60
  text "Layer-2" at 7267,1532.99 h60
  text "CF-004" at 8196.74,1532.99 h60
  text "1.18mil" at 9056.51,1532.99 h60
  text "Dielectric 3" at 7267,1412.99 h60
  text "PP-006" at 8196.74,1412.99 h60
  text "7.99mil" at 9056.51,1412.99 h60
  text "4.1" at 9706.35,1412.99 h60
  text "4" at 6857.09,1292.99 h60
  text "Bottom Layer" at 7267,1292.99 h60
  text "1.38mil" at 9056.51,1292.99 h60
  text "Bottom Solder" at 7267,1172.99 h60
  text "Solder Resist" at 8196.74,1172.99 h60
  text "0.39mil" at 9056.51,1172.99 h60
  text "3.5" at 9706.35,1172.99 h60
  text "Bottom Overlay" at 7267,1052.99 h60
  text "Total board thickness:" at 6857.09,932.99 h60
  text "62.44mil" at 9056.51,932.99 h60
Drill Drawing:
  circle w10: c6894.25,5229.33 r20
  circle w10: c6894.25,5229.33 r33.33
  circle w10: c6894.25,4929.33 r33.33
  lines w10: 6860.92,3262.67 6877.58,3262.67 6894.25,3246 6910.92,3262.67 6927.58,3262.67 6910.92,3279.33 6927.58,3296 6910.92,3296 6894.25,3312.67 6877.58,3296 6860.92,3296 6877.58,3279.33 6860.92,3262.67 ; 6860.92,3562.67 6877.58,3562.67 6877.58,3546 6910.92,3546 6910.92,3562.67 6927.58,3562.67 6927.58,3596 6910.92,3596 6910.92,3612.67 6877.58,3612.67 6877.58,3596 6860.92,3596 6860.92,3562.67 ; 6860.92,3846 6894.25,3862.67 6927.58,3846 6910.92,3879.33 6927.58,3912.67 6894.25,3896 6860.92,3912.67 6877.58,3879.33 6860.92,3846 ; 6860.92,4062.67 6927.58,4062.67 6894.25,3996 6860.92,4062.67 ; 6860.92,5046 6860.92,5062.67 6877.58,5079.33 6860.92,5096 6860.92,5112.67 6877.58,5112.67 6894.25,5096 6910.92,5112.67 6927.58,5112.67 6927.58,5096 6910.92,5079.33 6927.58,5062.67 6927.58,5046 6910.92,5046 6894.25,5062.67 6877.58,5046 6860.92,5046 ; 6860.92,5562.67 6927.58,5562.67 6894.25,5496 6860.92,5562.67 ; 6860.92,5646 6927.58,5646 6927.58,5712.67 6860.92,5712.67 6860.92,5646 ; 6860.92,5796 6860.92,5812.67 6877.58,5829.33 6860.92,5846 6860.92,5862.67 6877.58,5862.67 6894.25,5846 6910.92,5862.67 6927.58,5862.67 6927.58,5846 6910.92,5829.33 6927.58,5812.67 6927.58,5796 6910.92,5796 6894.25,5812.67 6877.58,5796 6860.92,5796 ; 6860.92,5979.33 6894.25,5946 6927.58,5979.33 6894.25,6012.67 6860.92,5979.33 ; 6860.92,6096 6927.58,6096 6927.58,6162.67 6860.92,6162.67 6860.92,6096 ; 6874.25,5059.33 6874.25,5069.33 6884.25,5079.33 6874.25,5089.33 6874.25,5099.33 6884.25,5099.33 6894.25,5089.33 6904.25,5099.33 6914.25,5099.33 6914.25,5089.33 6904.25,5079.33 6914.25,5069.33 6914.25,5059.33 6904.25,5059.33 6894.25,5069.33 6884.25,5059.33 6874.25,5059.33 ; 6874.25,5549.33 6914.25,5549.33 6894.25,5509.33 6874.25,5549.33 ; 6874.25,6109.33 6914.25,6109.33 6914.25,6149.33 6874.25,6149.33 6874.25,6109.33
  lines w15: 6801.12,3201 17058.25,3201 ; 6801.12,6351 17058.25,6351 ; 7352,3051 7352,6501 ; 8001.83,3051 8001.83,6501 ; 9151.49,3051 9151.49,6501 ; 9657.36,3051 9657.36,6501 ; 10391.17,3051 10391.17,6501 ; 11890.72,3051 11890.72,6501 ; 12480.57,3051 12480.57,6501 ; 13226.36,3051 13226.36,6501 ; 14565.97,3051 14565.97,6501 ; 15655.65,3051 15655.65,6501 ; 6801.12,3051 17058.25,3051 17058.25,6501 6801.12,6501 6801.12,3051
  text "Symbol" at 6891.12,6396 h72
  text "Count" at 7397,6396 h72
  text "Hole Size" at 8046.83,6396 h72
  text "Plated" at 9196.49,6396 h72
  text "Hole Type" at 9702.36,6396 h72
  text "Drill Layer Pair" at 10436.17,6396 h72
  text "Via/Pad" at 11935.72,6396 h72
  text "Pad Shape" at 12525.57,6396 h72
  text "Template" at 13271.36,6396 h72
  text "Hole Length" at 14610.97,6396 h72
  text "Routed Path Length" at 15700.65,6396 h72
  text "1083" at 7397,6246 h60
  text "11.81mil (0.300mm)" at 8046.83,6246 h60
  text "PTH" at 9196.49,6246 h60
  text "Round" at 9702.36,6246 h60
  text "Top Layer - Bottom Layer" at 10436.17,6246 h60
  text "Via" at 11935.72,6246 h60
  text "Rounded" at 12525.57,6246 h60
  text "(Mixed)" at 13271.36,6246 h60
  text "-" at 14610.97,6246 h60
  text "-" at 15700.65,6246 h60
  text "A" at 6862.03,6236.01 h66.67
  text "2" at 7397,6096 h60
  text "23.62mil (0.600mm)" at 8046.83,6096 h60
  text "PTH" at 9196.49,6096 h60
  text "Slot" at 9702.36,6096 h60
  text "Top Layer - Bottom Layer" at 10436.17,6096 h60
  text "Pad" at 11935.72,6096 h60
  text "Rounded" at 12525.57,6096 h60
  text "r90_170h60_140r100" at 13271.36,6096 h60
  text "55.12mil (1.400mm)" at 14610.97,6096 h60
  text "31.50mil (0.800mm)" at 15700.65,6096 h60
  text "2" at 7397,5946 h60
  text "23.62mil (0.600mm)" at 8046.83,5946 h60
  text "PTH" at 9196.49,5946 h60
  text "Slot" at 9702.36,5946 h60
  text "Top Layer - Bottom Layer" at 10436.17,5946 h60
  text "Pad" at 11935.72,5946 h60
  text "Rounded" at 12525.57,5946 h60
  text "(Mixed)" at 13271.36,5946 h60
  text "66.93mil (1.700mm)" at 14610.97,5946 h60
  text "43.31mil (1.100mm)" at 15700.65,5946 h60
  text "2" at 7397,5796 h60
  text "24.41mil (0.620mm)" at 8046.83,5796 h60
  text "NPTH" at 9196.49,5796 h60
  text "Round" at 9702.36,5796 h60
  text "Top Layer - Bottom Layer" at 10436.17,5796 h60
  text "Pad" at 11935.72,5796 h60
  text "Rounded" at 12525.57,5796 h60
  text "c0hn62" at 13271.36,5796 h60
  text "-" at 14610.97,5796 h60
  text "-" at 15700.65,5796 h60
  text "16" at 7397,5646 h60
  text "35.04mil (0.890mm)" at 8046.83,5646 h60
  text "PTH" at 9196.49,5646 h60
  text "Round" at 9702.36,5646 h60
  text "Top Layer - Bottom Layer" at 10436.17,5646 h60
  text "Pad" at 11935.72,5646 h60
  text "(Mixed)" at 12525.57,5646 h60
  text "(Mixed)" at 13271.36,5646 h60
  text "-" at 14610.97,5646 h60
  text "-" at 15700.65,5646 h60
  text "13" at 7397,5496 h60
  text "35.43mil (0.900mm)" at 8046.83,5496 h60
  text "PTH" at 9196.49,5496 h60
  text "Round" at 9702.36,5496 h60
  text "Top Layer - Bottom Layer" at 10436.17,5496 h60
  text "Pad" at 11935.72,5496 h60
  text "(Mixed)" at 12525.57,5496 h60
  text "(Mixed)" at 13271.36,5496 h60
  text "-" at 14610.97,5496 h60
  text "-" at 15700.65,5496 h60
  text "16" at 7397,5346 h60
  text "35.43mil (0.900mm)" at 8046.83,5346 h60
  text "PTH" at 9196.49,5346 h60
  text "Round" at 9702.36,5346 h60
  text "Top Layer - Bottom Layer" at 10436.17,5346 h60
  text "Pad" at 11935.72,5346 h60
  text "Rounded" at 12525.57,5346 h60
  text "c150h90m155mx155p150" at 13271.36,5346 h60
  text "-" at 14610.97,5346 h60
  text "-" at 15700.65,5346 h60
  text "I" at 6873.14,5336.01 h66.67
  text "8" at 7397,5196 h60
  text "37.40mil (0.950mm)" at 8046.83,5196 h60
  text "PTH" at 9196.49,5196 h60
  text "Round" at 9702.36,5196 h60
  text "Top Layer - Bottom Layer" at 10436.17,5196 h60
  text "Pad" at 11935.72,5196 h60
  text "(Mixed)" at 12525.57,5196 h60
  text "(Mixed)" at 13271.36,5196 h60
  text "-" at 14610.97,5196 h60
  text "-" at 15700.65,5196 h60
  text "11" at 7397,5046 h60
  text "39.37mil (1.000mm)" at 8046.83,5046 h60
  text "PTH" at 9196.49,5046 h60
  text "Round" at 9702.36,5046 h60
  text "Top Layer - Bottom Layer" at 10436.17,5046 h60
  text "Pad" at 11935.72,5046 h60
  text "(Mixed)" at 12525.57,5046 h60
  text "(Mixed)" at 13271.36,5046 h60
  text "-" at 14610.97,5046 h60
  text "-" at 15700.65,5046 h60
  text "8" at 7397,4896 h60
  text "40.16mil (1.020mm)" at 8046.83,4896 h60
  text "PTH" at 9196.49,4896 h60
  text "Round" at 9702.36,4896 h60
  text "Top Layer - Bottom Layer" at 10436.17,4896 h60
  text "Pad" at 11935.72,4896 h60
  text "Rounded" at 12525.57,4896 h60
  text "c153h102" at 13271.36,4896 h60
  text "-" at 14610.97,4896 h60
  text "-" at 15700.65,4896 h60
  text "32" at 7397,4746 h60
  text "49.21mil (1.250mm)" at 8046.83,4746 h60
  text "PTH" at 9196.49,4746 h60
  text "Round" at 9702.36,4746 h60
  text "Top Layer - Bottom Layer" at 10436.17,4746 h60
  text "Pad" at 11935.72,4746 h60
  text "(Mixed)" at 12525.57,4746 h60
  text "(Mixed)" at 13271.36,4746 h60
  text "-" at 14610.97,4746 h60
  text "-" at 15700.65,4746 h60
  text "E" at 6862.03,4736.01 h66.67
  text "16" at 7397,4596 h60
  text "51.18mil (1.300mm)" at 8046.83,4596 h60
  text "PTH" at 9196.49,4596 h60
  text "Round" at 9702.36,4596 h60
  text "Top Layer - Bottom Layer" at 10436.17,4596 h60
  text "Pad" at 11935.72,4596 h60
  text "(Mixed)" at 12525.57,4596 h60
  text "(Mixed)" at 13271.36,4596 h60
  text "-" at 14610.97,4596 h60
  text "-" at 15700.65,4596 h60
  text "B" at 6862.03,4586.01 h66.67
  text "2" at 7397,4446 h60
  text "55.12mil (1.400mm)" at 8046.83,4446 h60
  text "PTH" at 9196.49,4446 h60
  text "Round" at 9702.36,4446 h60
  text "Top Layer - Bottom Layer" at 10436.17,4446 h60
  text "Pad" at 11935.72,4446 h60
  text "(Mixed)" at 12525.57,4446 h60
  text "(Mixed)" at 13271.36,4446 h60
  text "-" at 14610.97,4446 h60
  text "-" at 15700.65,4446 h60
  text "D" at 6862.03,4436.01 h66.67
  text "8" at 7397,4296 h60
  text "59.06mil (1.500mm)" at 8046.83,4296 h60
  text "PTH" at 9196.49,4296 h60
  text "Round" at 9702.36,4296 h60
  text "Top Layer - Bottom Layer" at 10436.17,4296 h60
  text "Pad" at 11935.72,4296 h60
  text "(Mixed)" at 12525.57,4296 h60
  text "(Mixed)" at 13271.36,4296 h60
  text "-" at 14610.97,4296 h60
  text "-" at 15700.65,4296 h60
  text "H" at 6862.03,4286.01 h66.67
  text "6" at 7397,4146 h60
  text "62.99mil (1.600mm)" at 8046.83,4146 h60
  text "PTH" at 9196.49,4146 h60
  text "Round" at 9702.36,4146 h60
  text "Top Layer - Bottom Layer" at 10436.17,4146 h60
  text "Pad" at 11935.72,4146 h60
  text "Rounded" at 12525.57,4146 h60
  text "c300h160m305mx305p300" at 13271.36,4146 h60
  text "-" at 14610.97,4146 h60
  text "-" at 15700.65,4146 h60
  text "F" at 6862.03,4136.01 h66.67
  text "4" at 7397,3996 h60
  text "64.17mil (1.630mm)" at 8046.83,3996 h60
  text "PTH" at 9196.49,3996 h60
  text "Round" at 9702.36,3996 h60
  text "Top Layer - Bottom Layer" at 10436.17,3996 h60
  text "Pad" at 11935.72,3996 h60
  text "Rounded" at 12525.57,3996 h60
  text "c244h163" at 13271.36,3996 h60
  text "-" at 14610.97,3996 h60
  text "-" at 15700.65,3996 h60
  text "4" at 7397,3846 h60
  text "74.80mil (1.900mm)" at 8046.83,3846 h60
  text "PTH" at 9196.49,3846 h60
  text "Round" at 9702.36,3846 h60
  text "Top Layer - Bottom Layer" at 10436.17,3846 h60
  text "Pad" at 11935.72,3846 h60
  text "Rounded" at 12525.57,3846 h60
  text "c290h190m295mx295p290" at 13271.36,3846 h60
  text "-" at 14610.97,3846 h60
  text "-" at 15700.65,3846 h60
  text "1" at 7397,3696 h60
  text "98.43mil (2.500mm)" at 8046.83,3696 h60
  text "NPTH" at 9196.49,3696 h60
  text "Round" at 9702.36,3696 h60
  text "Top Layer - Bottom Layer" at 10436.17,3696 h60
  text "Pad" at 11935.72,3696 h60
  text "Rounded" at 12525.57,3696 h60
  text "c0hn250p0" at 13271.36,3696 h60
  text "-" at 14610.97,3696 h60
  text "-" at 15700.65,3696 h60
  text "G" at 6862.03,3686.01 h66.67
  text "4" at 7397,3546 h60
  text "122.05mil (3.100mm)" at 8046.83,3546 h60
  text "PTH" at 9196.49,3546 h60
  text "Round" at 9702.36,3546 h60
  text "Top Layer - Bottom Layer" at 10436.17,3546 h60
  text "Pad" at 11935.72,3546 h60
  text "Rounded" at 12525.57,3546 h60
  text "c500h310" at 13271.36,3546 h60
  text "-" at 14610.97,3546 h60
  text "-" at 15700.65,3546 h60
  text "4" at 7397,3396 h60
  text "127.95mil (3.250mm)" at 8046.83,3396 h60
  text "NPTH" at 9196.49,3396 h60
  text "Round" at 9702.36,3396 h60
  text "Top Layer - Bottom Layer" at 10436.17,3396 h60
  text "Pad" at 11935.72,3396 h60
  text "Rounded" at 12525.57,3396 h60
  text "c0hn325p-1" at 13271.36,3396 h60
  text "-" at 14610.97,3396 h60
  text "-" at 15700.65,3396 h60
  text "J" at 6862.03,3386.01 h66.67
  text "4" at 7397,3246 h60
  text "127.95mil (3.250mm)" at 8046.83,3246 h60
  text "NPTH" at 9196.49,3246 h60
  text "Round" at 9702.36,3246 h60
  text "Top Layer - Bottom Layer" at 10436.17,3246 h60
  text "Pad" at 11935.72,3246 h60
  text "Rounded" at 12525.57,3246 h60
  text "c0hn325" at 13271.36,3246 h60
  text "-" at 14610.97,3246 h60
  text "-" at 15700.65,3246 h60
  text "1246 Total" at 7397,3096 h60
  text "Slot definitions :" at 6891.12,2951.03 h60
  text "Routed Path Length" at 7923.81,2951.03 h60
  text "= Calculated from tool start centre position to tool end centre position." at 9026.48,2951.03 h60
  text "Hole Length" at 7923.81,2851.05 h60
  text "= Routed Path Length + Tool Size = Slot length as defined in the PCB layout" at 8616.61,2851.05 h60

## Dimensions
0,6531 to 0,0 on Dimension
6225.19,6531 to 0,6531 on Dimension

## Text inside footprints (layer, text, board x,y; h text height)
J4: Top Overlay "PCB Edge" at 50.03,2494.26 h35 r270
J8: Top Overlay "1" at 83.8,695.18 h40 r90
J13: Top Overlay "1" at 3377.49,6230.47 h40 r180
J14: Top Overlay "1" at 2620.49,6230.47 h40 r180
SW2: Top Overlay "ON" at 166,2741 h35 r90; Top Overlay "1" at 319,2750 h40; Top Overlay "2" at 314,2848 h40; Top Overlay "3" at 313.41,2947 h40